# Altium PCB pcb_document_of_best_pcb_ever.PcbDoc
Units mm, origin at the board's own origin, x right, y up, seen from the top; angles counter-clockwise.
Board outline 190.37 x 187.07 mm, 2 copper layers (Top Layer, Bottom Layer); 50 components, 85 nets, 270 pads, 57 vias.
Unrouted connection lines stored in the file: 68.
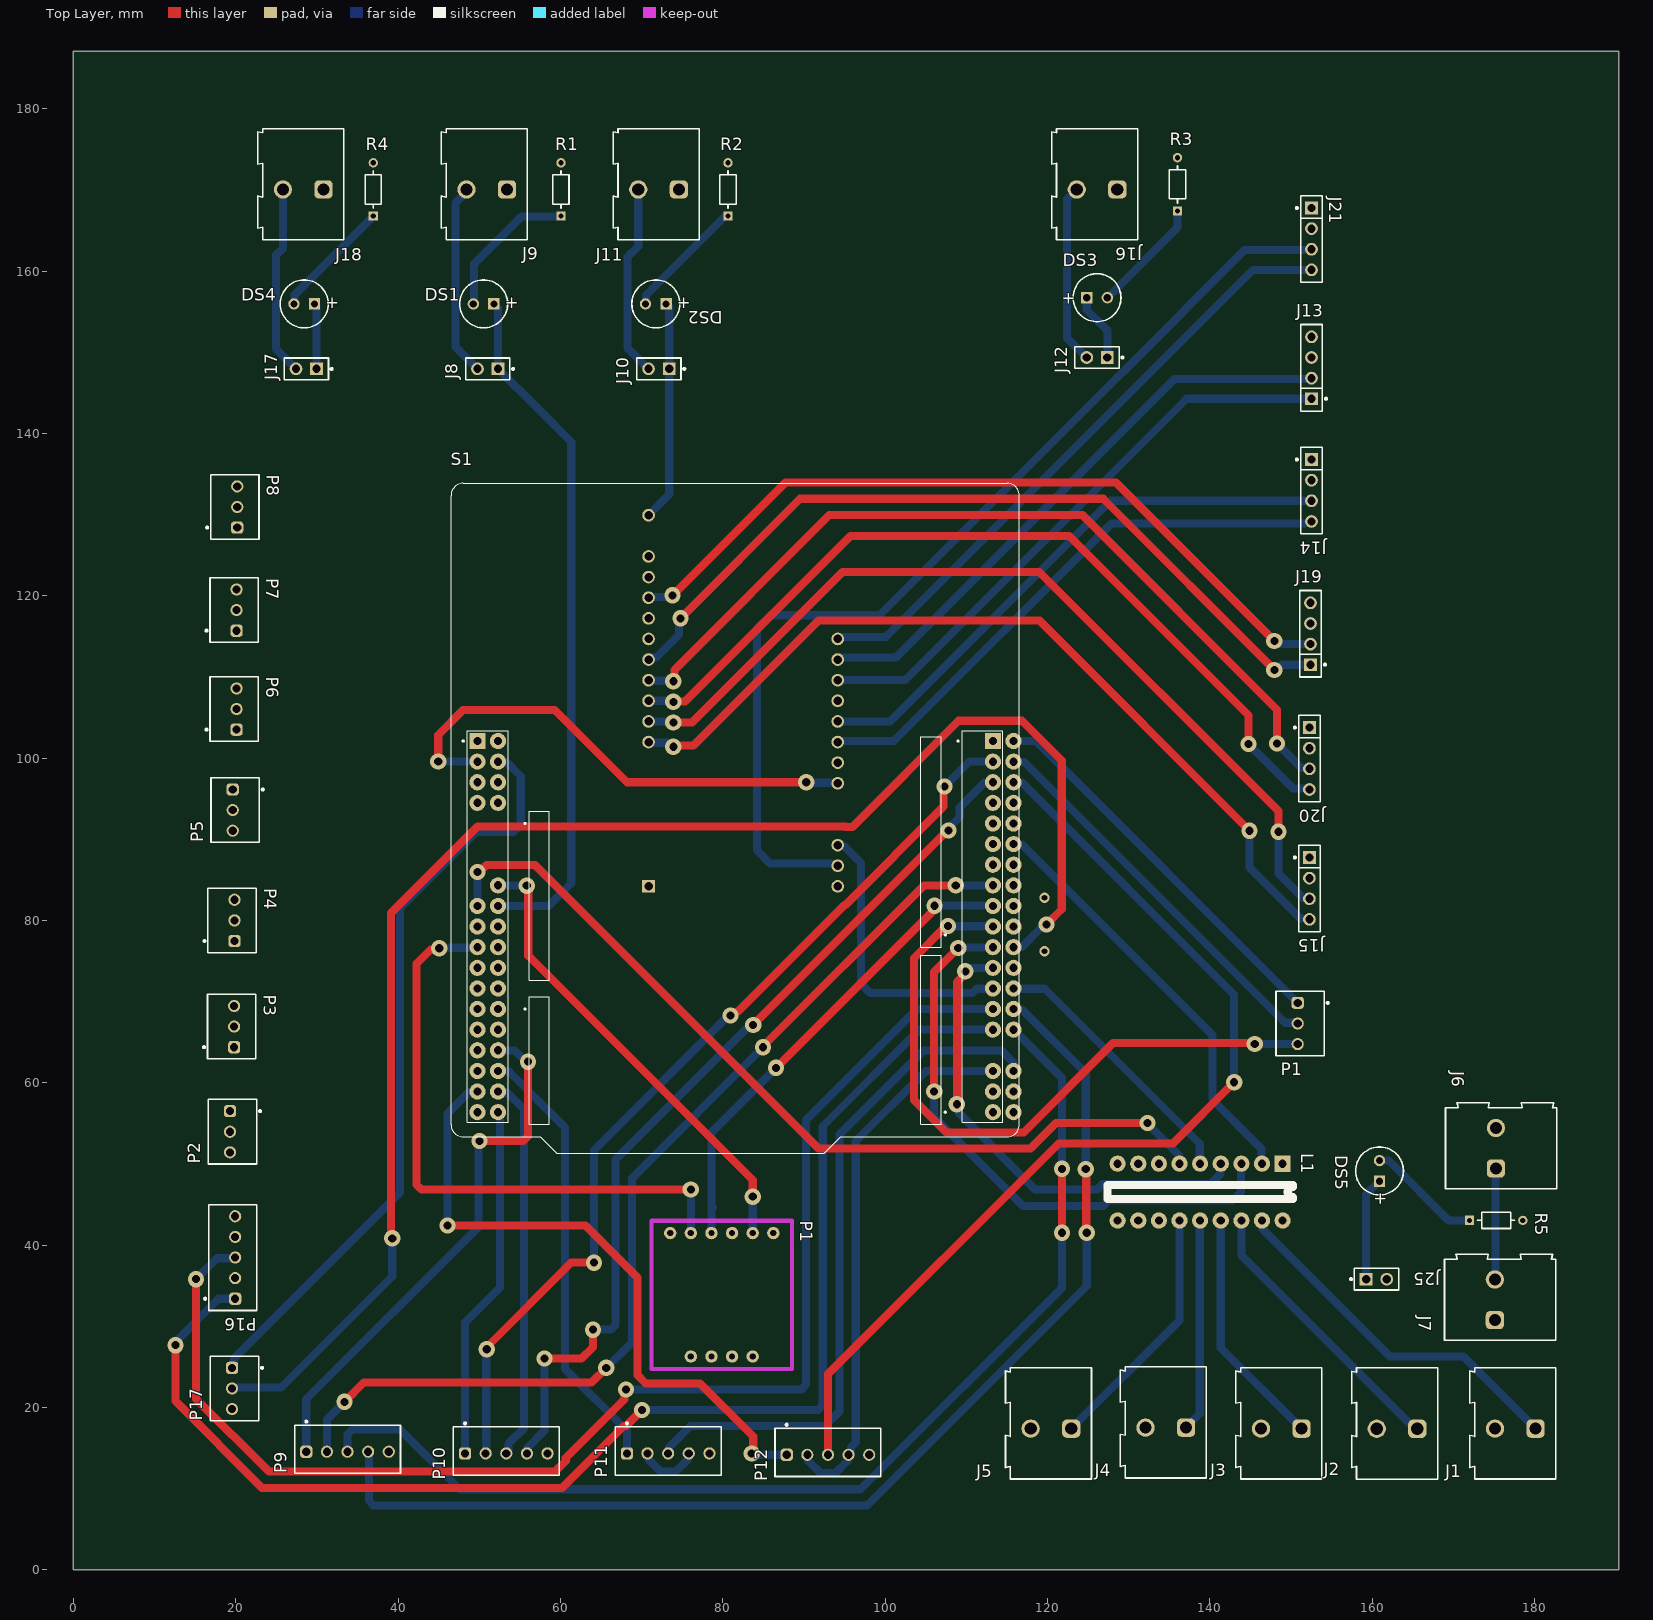
[diagram p0: Top Layer view]
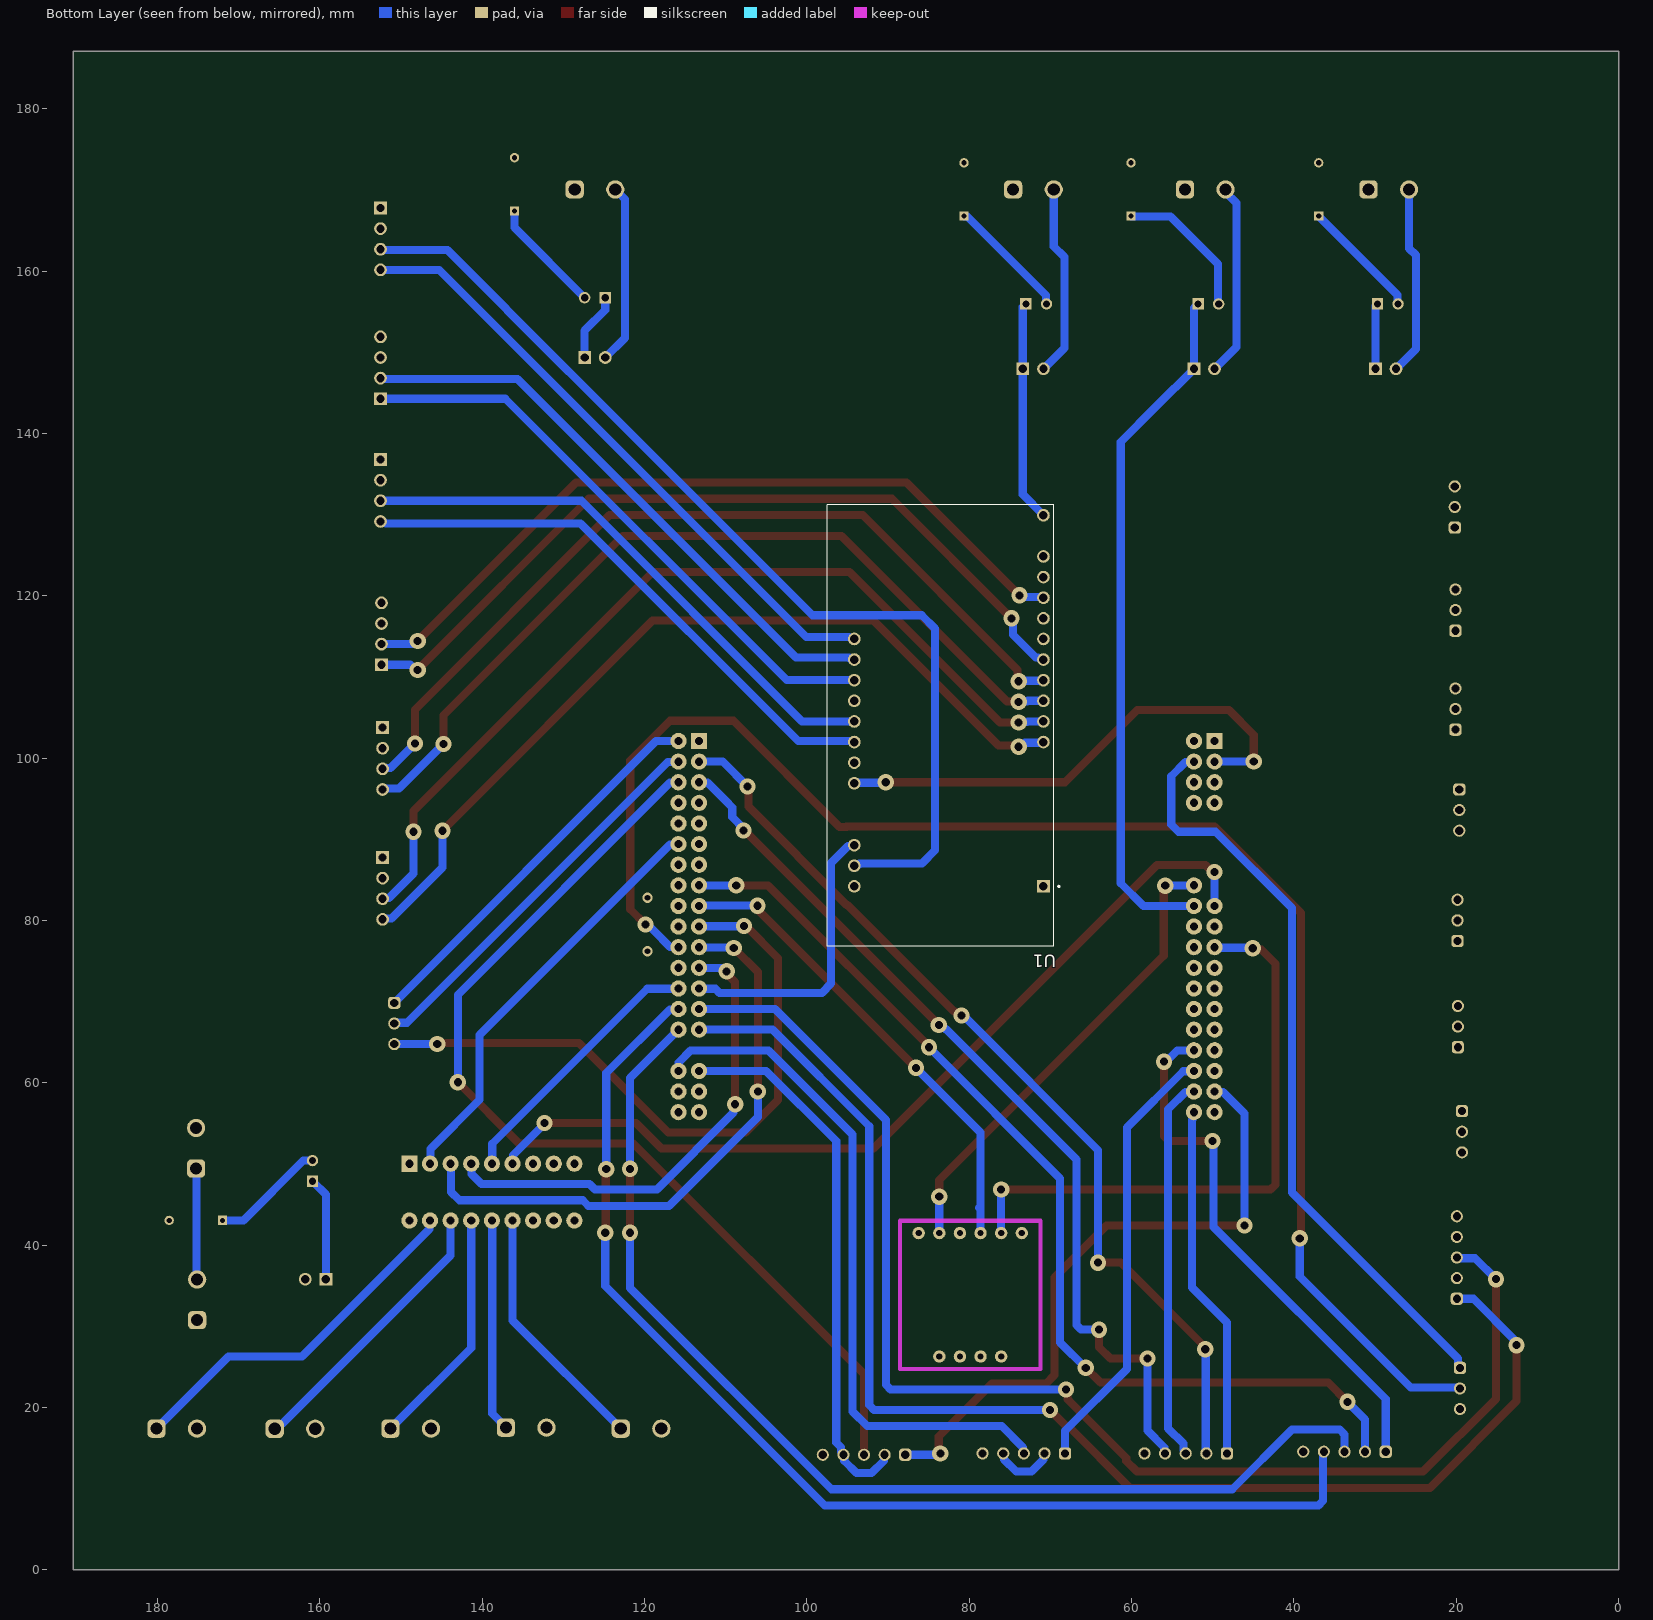
[diagram p1: Bottom Layer view, seen from below]
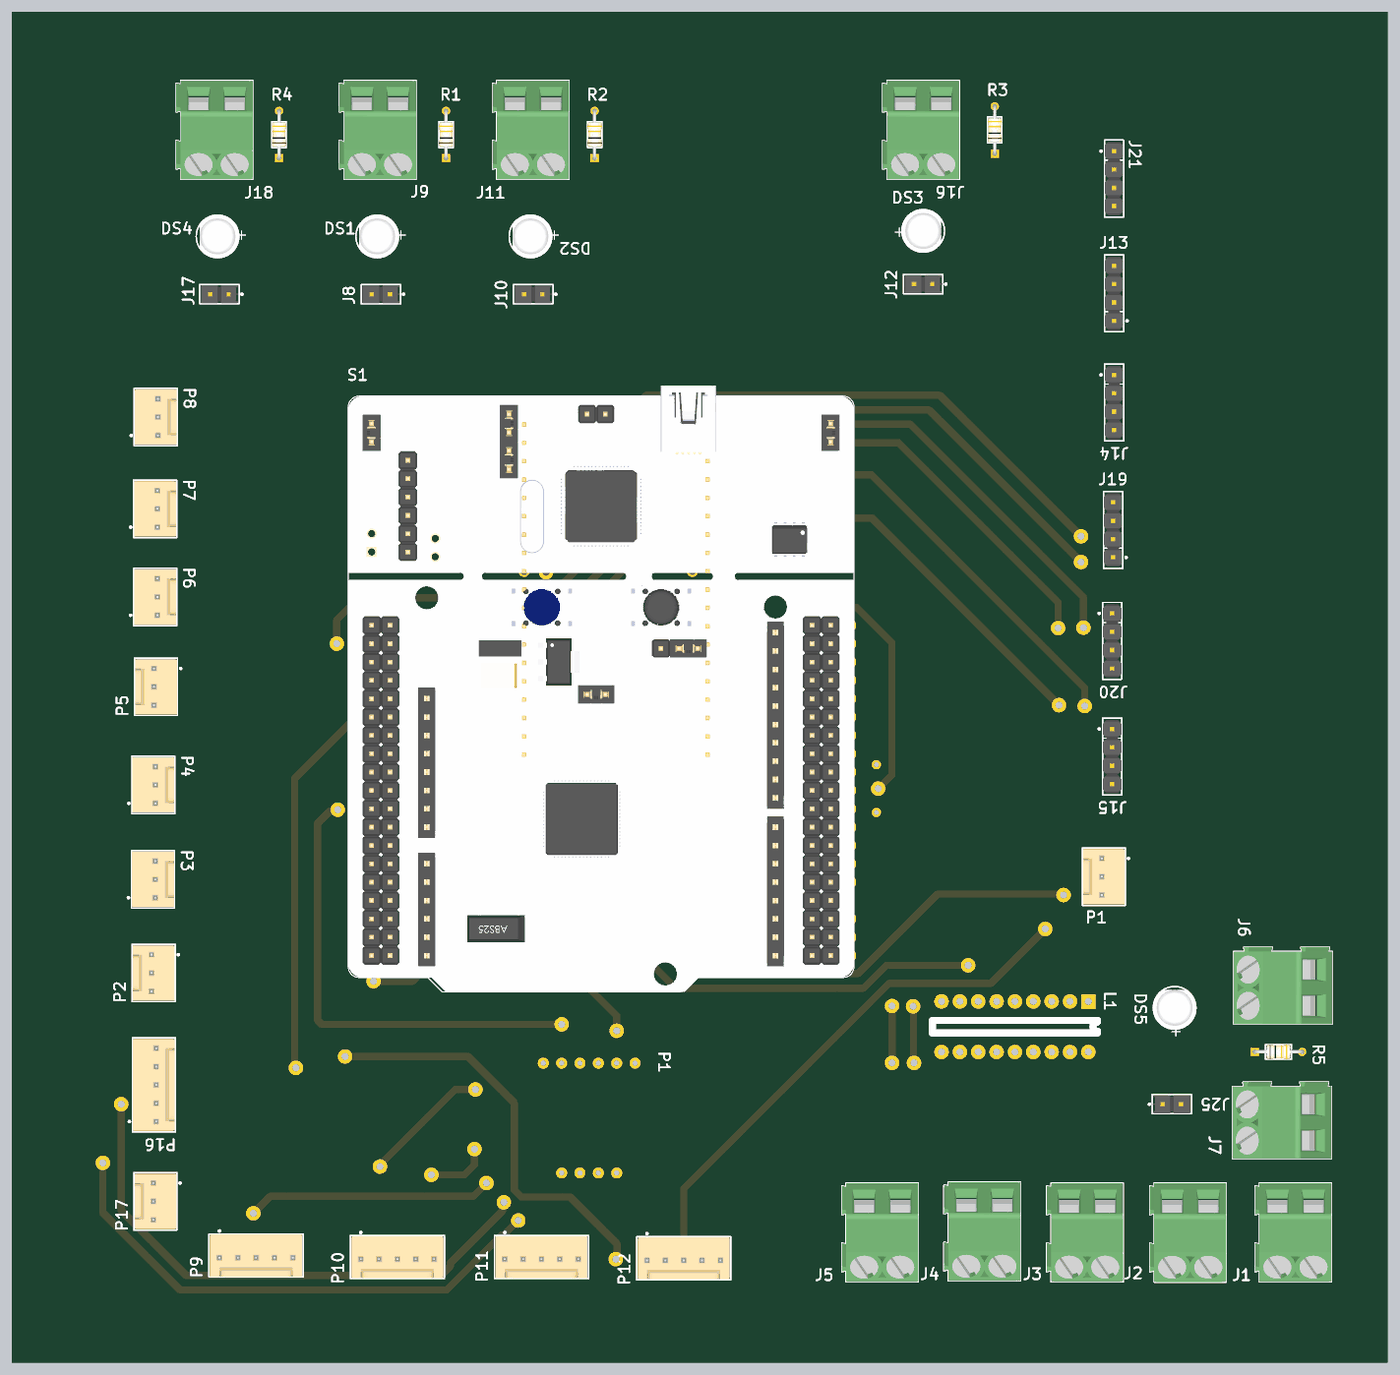
[diagram p2: 3D render of the assembled board from above, using the file's embedded part models]

## Layer stack, top to bottom
Top Solder: solder mask 0.0102, Solder Resist, Dk 3.5
Top Layer: signal copper 0.0356
Dielectric 1: dielectric 0.32, FR-4, Dk 4.8
Bottom Layer: signal copper 0.0356
Bottom Solder: solder mask 0.0102, Solder Resist, Dk 3.5

## Board outline
0,0 190.373,0 190.373,187.071 0,187.071

## Design rules (kind name [scope] priority, off if disabled: settings)
Clearance [All] p1: gap=1 ignorepadtopadclearanceinfootprint=FALSE
PlaneClearance [All] p1: clearance=1
PlaneConnect [All] p1: planeconnectstyle=Relief reliefexpansion=1 reliefentries=4 reliefconductorwidth=1 reliefairgap=1
PolygonConnect [All] p1: connectstyle=Relief reliefconductorwidth=1 reliefentries=4 polygonreliefangle="90 Angle" airgapwidth=1
RoutingCorners [All] p1: cornerstyle=45-Degree minsetback=0.5 maxsetback=1
RoutingVias [All] p1: holewidth=1 width=1 viastyle="Through Hole" minholewidth=0.711 minwidth=0.5 maxholewidth=1 maxwidth=1
SolderMaskExpansion [All] p1: expansion=0 istentingtop=FALSE
SupplyNets "Schematic Supply Nets" [InNet('GND')] p1: voltage=0.000
Width [InNetClass('All Nets')] p1: maxlimit=2 minlimit=0.5 preferedwidth=1
27 further rules are at their usual default settings.

## Components (designator, comment, footprint, x,y, rotation, side; value= is the part's Value field where it differs from the comment)
DS1 "WP7113SYD" KING-WP7113SYD_V 50.546,155.956 r180 top
DS2 "WP7113SYD" KING-WP7113SYD_V 71.755,155.956 r180 top
DS3 "WP7113SYD" KING-WP7113SYD_V 126.111,156.718 r0 top
DS4 "WP7113SYD" KING-WP7113SYD_V 28.448,155.956 r180 top
DS5 "WP7113SYD" KING-WP7113SYD_V 160.909,49.149 r90 top
J1 "691211720002" 691211720002 177.633,18.049 r180 top
J2 "691211720002" 691211720002 163.068,18.034 r180 top
J3 "691211720002" 691211720002 148.804,18.049 r180 top
J4 "691211720002" 691211720002 134.58,18.176 r180 top
J5 "691211720002" 691211720002 120.436,18.049 r180 top
J6 "691211720002" 691211720002 175.895,51.943 r90 top
J7 "691211720002" 691211720002 175.768,33.274 r90 top
J8 "TSW-102-07-L-S" FP-TSW-102-07-L-S-MFG 51.054,147.955 r180 top
J9 "691211720002" 691211720002 50.927,170.703 r180 top
J10 "TSW-102-07-L-S" FP-TSW-102-07-L-S-MFG 72.136,147.955 r180 top
J11 "691211720002" 691211720002 72.096,170.703 r180 top
J12 "TSW-102-07-L-S" FP-TSW-102-07-L-S-MFG 126.111,149.352 r180 top
J13 "M20-9990445" FP-M20-9990445-MFG 152.527,148.082 r90 top
J14 "M20-9990445" FP-M20-9990445-MFG 152.527,132.969 r270 top
J15 "M20-9990445" FP-M20-9990445-MFG 152.273,83.947 r270 top
J16 "691211720002" 691211720002 126.111,170.703 r180 top
J17 "TSW-102-07-L-S" FP-TSW-102-07-L-S-MFG 28.702,147.955 r180 top
J18 "691211720002" 691211720002 28.321,170.703 r180 top
J19 "M20-9990445" FP-M20-9990445-MFG 152.4,115.316 r90 top
J20 "M20-9990445" FP-M20-9990445-MFG 152.273,99.949 r270 top
J21 "M20-9990445" FP-M20-9990445-MFG 152.527,163.957 r270 top
J25 "TSW-102-07-L-S" FP-TSW-102-07-L-S-MFG 160.528,35.814 r0 top
L1 "Component_1" DIP18 148.971,50.038 r270 top
P1 "Component_1" PCBComponent_1#1 73.533,41.489 r270 top
P1 "61900311121" 61900311121 151.13,67.31 r90 top
P2 "61900311121" 61900311121 19.604,53.975 r90 top
P3 "61900311121" 61900311121 19.512,66.929 r270 top
P4 "61900311121" 61900311121 19.558,80.01 r270 top
P5 "61900311121" 61900311121 19.939,93.599 r90 top
P6 "61900311121" 61900311121 19.812,106.045 r270 top
P7 "61900311121" 61900311121 19.812,118.237 r270 top
P8 "61900311121" 61900311121 19.893,130.937 r270 top
P9 "61900511121" 61900511121 33.782,14.859 r180 top
P10 "61900511121" 61900511121 53.34,14.651 r180 top
P11 "61900511121" 61900511121 73.279,14.651 r180 top
P12 "61900511121" 61900511121 92.964,14.478 r180 top
P16 "61900511121" 61900511121 19.639,38.481 r270 top
P17 "61900311121" 61900311121 19.858,22.352 r90 top
R1 "CF18JT10K0" FP-CF18-MFG 60.071,170.053 r90 top value=10kΩ
R2 "CF18JT10K0" FP-CF18-MFG 80.645,170.053 r90 top value=10kΩ
R3 "CF18JT10K0" FP-CF18-MFG 136.017,170.688 r90 top value=10kΩ
R4 "CF18JT10K0" FP-CF18-MFG 36.957,170.053 r90 top value=10kΩ
R5 "CF18JT10K0" FP-CF18-MFG 175.282,43.053 r0 top value=10kΩ
S1 "Component_1" PCBComponent_1#2 87.63,95.885 r0 top locked
U1 "ESP32-DEVKITC-32D" MODULE_ESP32-DEVKITC-32D 83.566,103.961 r0 bottom locked

## Footprints (in the part's own frame and the unit in brackets; to place one, negate y for a bottom-side part, rotate by r counter-clockwise, add the part's x,y. Pads: shape width x height; smd on the part's side, far side on the other; paste and mask are expansions set on the pad)
61900311121 [mm] "2.54mm Male Locking Header, 3p"
  rrect50% 1.5x1.5 hole 1: 1(2.54,0.3)
  round 1.5 hole 1: 2(0,0.3) 3(-2.54,0.3)
  silkscreen extent -3.98,-3.52 3.98,2.98, body extent -3.81,-2.9 3.81,2.9, height 11.53
61900511121 [mm] "2.54mm Male Locking Header, 5p"
  rrect50% 1.5x1.5 hole 1: 1(5.08,0.3)
  round 1.5 hole 1: 2(2.54,0.3) 3(0,0.3) 4(-2.54,0.3) 5(-5.08,0.3)
  silkscreen extent -6.52,-3.52 6.52,2.97, body extent -6.35,-2.9 6.35,2.9, height 11.53
691211720002 [mm] "5,00mm - modular - green -45¡ã entry with rising cage clamp - 02p"
  rrect50% 2.25x2.25 hole 1.5: 1(-2.5,0.65)
  round 2.25 hole 1.5: 2(2.5,0.65)
  silkscreen extent -5,-6.85 5.6,6.85, body extent -5,-6.85 5.6,6.85, height 15.72
DIP18 [mm]
  rect 2x2 hole 1: 1(0,0)
  round 2 hole 1: 2(0,-2.54) 3(0,-5.08) 4(0,-7.62) 5(0,-10.16) 6(0,-12.7) 7(0,-15.24) 8(0,-17.78) 9(0,-20.32) 10(7,-20.32) 11(7,-17.78) 12(7,-15.24) 13(7,-12.7) 14(7,-10.16) 15(7,-7.62) 16(7,-5.08) 17(7,-2.54) 18(7,0)
  silkscreen extent 2.63,-21.59 4.36,1.27
FP-CF18-MFG [mm]
  rect 1.15x1.15 hole 0.65 paste-2539.97 mask+0: 1(-3.28,0)
  round 1.15 hole 0.65 paste-2539.97 mask+0: 2(3.28,0)
  silkscreen extent -2.3,-1 2.3,1, body extent -3.96,-1.1 3.96,1.1, height 0.25
FP-M20-9990445-MFG [mm]
  rect 1.57x1.57 hole 1.02 paste-2539.97 mask+0: 1(-3.81,0)
  round 1.57 hole 1.02 paste-2539.97 mask+0: 2(-1.27,0) 3(1.27,0) 4(3.81,0)
  silkscreen extent -5.33,-1.92 5.33,1.32, body extent -5.43,-1.42 5.43,1.42, height 0.25
FP-TSW-102-07-L-S-MFG [mm]
  rect 1.57x1.57 hole 1.02 paste-2539.97 mask+0: 1(-1.27,0)
  round 1.57 hole 1.02 paste-2539.97 mask+0: 2(1.27,0)
  silkscreen extent -3.25,-1.34 2.73,1.34, body extent -2.83,-1.44 2.83,1.44, height 0.25
KING-WP7113SYD_V [mm] "THD, 2-Leads, Dia 5.9mm, Body Length 8.6mm"
  rect 1.4x1.4 hole 0.889: 1(-1.27,0)
  round 1.4 hole 0.889: 2(1.27,0)
  silkscreen extent -2.95,-2.95 2.95,2.95, body extent -2.95,-2.95 2.5,2.95, height 15.5
MODULE_ESP32-DEVKITC-32D [mm]
  rect 1.56x1.56 / inner round 1.56 / far side rect 1.56x1.56 hole 1.04: J2-1(-12.7,19.76)
  round 0 all layers, no hole: J2-2(-12.7,17.22) J2-3(-12.7,14.68) J2-4(-12.7,12.14) J2-5(-12.7,9.6) J2-6(-12.7,7.06) J2-7(-12.7,4.52) J2-18(-12.7,-23.42) J3-4(10.6,12.14) J3-5(10.6,9.6) J3-14(10.6,-13.26) J3-15(10.6,-15.8) J3-16(10.6,-18.34) J3-17(10.6,-20.88) J3-18(10.6,-23.42) J3-19(10.6,-25.96)
  round 1.56 hole 1.04: J2-8(-12.7,1.98) J2-9(-12.7,-0.56) J2-10(-12.7,-3.1) J2-11(-12.7,-5.64) J2-12(-12.7,-8.18) J2-13(-12.7,-10.72) J2-14(-12.7,-13.26) J2-15(-12.7,-15.8) J2-16(-12.7,-18.34) J2-17(-12.7,-20.88) J2-19(-12.7,-25.96) J3-1(10.6,19.76) J3-2(10.6,17.22) J3-3(10.6,14.68) J3-6(10.6,7.06) J3-7(10.6,4.52) J3-8(10.6,1.98) J3-9(10.6,-0.56) J3-10(10.6,-3.1) J3-11(10.6,-5.64) J3-12(10.6,-8.18) J3-13(10.6,-10.72)
  silkscreen extent -14.7,-27.25 13.95,27.15, body extent -13.97,-27.9 13.97,27.2, height 6.69
PCBComponent_1#1 [mil]
  round 60 hole 30: 3V3(0,400) ADR(598.43,300) GND(0,300) INT(598.43,400) PS0(598.43,200) PS1(598.43,100) RST(0,0) SCL(0,200) SDA(0,100) VIN(0,500)
  Keep-Out Layer lines w19.68: -60,545 -60,590 660,590 660,-90 -60,-90 -60,565
PCBComponent_1#2 [mil]
  rect 78.74x78.74 hole 40.16: 1(-1490,245) 58(1010,245)
  round 78.74 hole 40.16: 2(-1390,245) 3(-1490,145) 4(-1390,145) 5(-1490,45) 6(-1390,45) 7(-1490,-55) 8(-1390,-55) 16(-1390,-455) 17(-1490,-555) 18(-1390,-555) 19(-1490,-655) 20(-1390,-655) 21(-1490,-755) 22(-1390,-755) 23(-1490,-855) 24(-1390,-855) 25(-1490,-955) 26(-1390,-955) 27(-1490,-1055) 28(-1390,-1055) 29(-1490,-1155) 30(-1390,-1155) 31(-1490,-1255) 32(-1390,-1255) 33(-1490,-1355) 34(-1390,-1355) 35(-1490,-1455) 36(-1390,-1455) 37(-1490,-1555) 38(-1390,-1555) 39(1110,245) 40(1110,145) 41(1110,45) 42(1110,-55) 43(1110,-155) 44(1110,-255) 45(1110,-355) 46(1110,-455) 47(1110,-555) 48(1110,-655) 49(1110,-755) 50(1110,-855) 51(1110,-955) 52(1110,-1055) 53(1110,-1155) 55(1110,-1355) 56(1110,-1455) 57(1110,-1555) 59(1010,145) 60(1010,45) 61(1010,-55) 62(1010,-155) 63(1010,-255) 64(1010,-355) 65(1010,-455) 66(1010,-555) 67(1010,-655) 68(1010,-755) 69(1010,-855) 70(1010,-955) 71(1010,-1055) 72(1010,-1155) 74(1010,-1355) 75(1010,-1455) 76(1010,-1555)
  round 0 all layers, no hole: 9(-1490,-155) 10(-1390,-155) 11(-1490,-255) 12(-1390,-255) 13(-1490,-355) 14(-1390,-355) 15(-1490,-455) 54(1110,-1255) 73(1010,-1255)
  silkscreen extent -1618,-1753 1138,1495, body extent -1618,-1753 1138,1552, height 483

## Part data
DS1 DS2 DS3 DS4 DS5: library part CMP-1757-00003-1, "The Super Bright Yellow Device, 2 V, -40 to 85 degC, 2-Pin THD, RoHS, Tape and Reel", Case\Package=Axial, Max Operating Temperature="155 degC", Min Operating Temperature="-55 degC", Package Quantity=200, Power Rating="250 mW", Resistance="22.1 kohm", Tolerance=1%, Voltage Rating="250 V", ComponentLink1Description=Datasheet, ComponentLink1URL=http://www.kingbrightusa.com/images/catalog/SPEC/WP7113SYD.pdf, DatasheetVersion="Rev. 7B, 01/2015", Length="0.248 inch", Mount="Through Hole", PackageDescription="2-Pin Through Hole Device, Dia 5.9 mm, Body Length 8.6 mm", PackageReference=WP7113SYD, Packaging=Bulk, RoHSCompliant=true
J1 J2 J3 J4 J5 J6 J7 J9 J11 J16 J18: library part CMP-1502-02524-3, "211 Series 5MM Pitch Straight, Pcb Terminal Block, Through Hole, 2 Way", Color=Green, Current=10A, Max Operating Temperature=105°C, Min Operating Temperature=-40°C, Voltage=300V, Connector Type="PCB, Terminal Block", Contact Material=Brass, Contact Plating=Tin, Height=15.5mm, Housing Material=Nylon, Lead Pitch=5mm, Length=13.7mm, Mount="Through Hole", Number of Contacts=2, Number of Levels=1, Number of Pins=2, Number of Positions Per Level=2, Packaging=Box, Pitch=5.0038mm, Plating="Brass, Steel", REACH SVHC=Unknown, RoHS=Compliant, Stripping Length=-7mm, Termination=Screw, Width=10mm, Wire Gauge (Max)=24AWG, Wire Gauge (Min)=12AWG, Wire/Cable Gauge=12AWG
J8 J10 J12 J17 J25: library part CMP-02766-001428-1, "CONN HEADER VERT 2POS 2.54MM", Color=Black, Current Rating=7.6A, Max Operating Temperature=125°C, Max Voltage Rating (AC)=550V, Min Operating Temperature=-55°C, Package Quantity=1, Connector Type="Male Pin", Contact Material=Bronze, Contact Mating Length=0.23inch, Contact Plating=Gold, Contact Type="Male Pin", Depth=2.54mm, Gender=Male, Housing Color=Black, Housing Material=Polyester, Lead Free="Lead Free", Length=5.08mm, Max Current Rating=7.6A, Mount="Through Hole", Number of Contacts=2, Number of Positions=2, Number of Rows=1, Orientation=Straight, Packaging=Bulk, Pitch=2.54mm, Radiation Hardening=No, REACH SVHC="No SVHC", RoHS Compliant=Yes, Series=TSW, Termination=Solder, Voltage Rating=550V, Width=2.54mm
J13 J14 J15 J19 J20 J21: library part CMP-00671-05399696-1, "M20-9990445 Conn Unshrouded Header HDR 4 POS 2.54mm Solder ST Thru-Hole Bulk/Loose", Case/Package=SIL, Color=Black, Contact Resistance=25mΩ, Current Rating=3A, Insulation Resistance=10GΩ, Max Operating Temperature=105°C, Min Operating Temperature=-40°C, Voltage Rating (AC)=750V, Connector Type="Male Pin", Contact Material="Brass, Bronze, Gold, Nickel", Contact Mating Length=6.096mm, Contact Plating=Gold, Depth=2.54mm, Gender=Male, Height=2.54mm, Housing Color=Black, Housing Material=Nylon, Lead Pitch=2.54mm, Length=10.16mm, Max Current Rating=3A, Mount="Through Hole", NexarPartId=5399696, Number of Contacts=4, Number of Pins=4, Number of Positions=4, Number of Rows=1, Orientation=Straight, Pitch=2.54mm, Radiation Hardening=No, REACH SVHC="No SVHC", RoHS=Compliant, Termination=Solder, Voltage Rating (DC)=750V, Weight=45.359237g, Width=12.7mm
P1 P2 P3 P4 P5 P6 P7 P8 P17: library part CMP-1502-00585-3, "Wr-wtb Series, 2.54MM Pitch 3 Way 1 Row Straight Pcb Header, Through Hole", Color=Beige, Contact Resistance=20mΩ, Current Rating=3A, Flammability Rating="UL94 V-0", Insulation Resistance=1GΩ, Max Operating Temperature=105°C, Min Operating Temperature=-40°C, Operating Supply Voltage=250V, Connector Type="Male Pin", Contact Gender=Male, Contact Material=Copper, Contact Mating Length=7.493mm, Contact Plating=Tin, Fastening Type=Friction, Gender=Male, Height=12.5mm, Housing Material=Nylon, Lead Pitch=2.54mm, Length=7.62mm, Mount="Through Hole", Number of Contacts=3, Number of Pins=3, Number of Positions=3, Number of Rows=1, Orientation=Vertical, Packaging=Bulk, Pitch=2.54mm, RoHS=Compliant, Termination="Through Hole", Voltage Rating=250V, Width=7.66mm
P9 P10 P11 P12 P16: library part CMP-1502-00587-3, "Wr-wtb Series, 2.54MM Pitch 5 Way 1 Row Straight Pcb Header, Through Hole", Color=Beige, Contact Resistance=20mΩ, Current Rating=3A, Flammability Rating="UL94 V-0", Insulation Resistance=1GΩ, Max Operating Temperature=105°C, Min Operating Temperature=-40°C, Operating Supply Voltage=250V, Connector Type="Male Pin", Contact Gender=Male, Contact Material=Copper, Contact Mating Length=7.493mm, Contact Plating=Tin, Fastening Type=Friction, Gender=Male, Height=12.5mm, Housing Material=Nylon, Lead Free="Lead Free", Lead Pitch=2.54mm, Length=12.7mm, Mount="Through Hole", Number of Contacts=5, Number of Pins=5, Number of Positions=5, Number of Rows=1, Orientation=Vertical, Packaging=Bulk, Pitch=2.54mm, RoHS=Compliant, Termination="Through Hole", Voltage Rating=250V, Width=12.74mm
R1 R2 R3 R4 R5: library part CMP-26528-000002-1, "RES 10K OHM 1/8W 5% CF AXIAL", Manufacturer="Stackpole Electronics", Package=CF18, Power Rating=0.125W, Resistance=10kΩ, Temperature="-55°C to +155°C", Temperature Coefficient=0-500ppm/°C, Temperature Range High=+155°C, Temperature Range Low=-55°C, Tolerance=5%, Voltage Rating=250V, Automotive=No, Category=Res, ComponentLink2Description=Datasheet, ComponentLink2URL=http://www.seielect.com/Catalog/SEI-CF_CFM.pdf, Composition="Carbon Film", Device Class L1="Passive Components", Device Class L2=Resistors, Device Class L3="Through-Hole Resistors", Digikey Description="RES 10K OHM 1/8W 5% CF AXIAL", Height=2mm, Ipc Land Pattern Name=RESAD656W65L360D200, Lead Free=Yes, Manufacturer Part Number=CF18JT10K0, Octopart=https://octopart.com/cf18jt10k0-stackpole+electronics-19205642, RoHS=TRUE, Series=CF
U1: "WiFi Development Tools (802.11) ESP32 General Development Kit, ESP32-WROOM-32D on the board", Package=None, Check_prices=https://www.snapeda.com/parts/ESP32-DEVKITC-32D/Espressif+Systems/view-part/?ref=eda, MF="Espressif Systems", MP=ESP32-DEVKITC-32D, SnapEDA_Link=https://www.snapeda.com/parts/ESP32-DEVKITC-32D/Espressif+Systems/view-part/?ref=snap

## Via types
v1: diameter 2, hole 1, Top Layer to Bottom Layer, 55 vias
v2: diameter 1.27, hole 0.711, Top Layer to Bottom Layer, 2 vias

## Nets (pads, with @x,y where several pads share a name; then routed paths per layer and width w, separated by ;. In a path a pad name is that pad's centre, name@x,y a point inside that pad or via, vN(x,y) a via of type N, cw(c..) or ccw(c..) an arc to the next point about the centre after c; other vN are vias at no path point)
e1_ch1: J13.1 U1.J3-11 | length 72.7
  Bottom Layer w1: U1.J3-11 102.489,109.601 137.16,144.272 J13.1
e1_ch2: J13.2 U1.J3-12 | length 72.7
  Bottom Layer w1: U1.J3-12 94.273,112.248 94.669,112.248 94.822,112.401 101.352,112.401 135.654,146.703 152.418,146.703 J13.2
e2_ch1: J14.3 U1.J3-9 | length 69.6
  Bottom Layer w1: U1.J3-9 100.584,104.521 127.762,131.699 J14.3
e2_ch2: J14.4 U1.J3-8 | length 69.6
  Bottom Layer w1: U1.J3-8 94.273,102.088 101.072,102.088 127.889,128.905 151.87,128.905 152.015,129.05 152.418,129.05 J14.4
e3_ch1: J19.2 U1.J2-15 | length 95.7
  Top Layer w1: v1(73.812,120.053) 87.715,133.956 128.426,133.956 v1(147.955,114.427)
  Bottom Layer w1: U1.J2-15 70.973,119.868 73.628,119.868 v1(73.812,120.053) ; v1(147.955,114.427) 148.226,114.427 148.607,114.046 J19.2
e3_ch2: J19.1 U1.J2-12 | length 99.8
  Top Layer w1: v1(74.803,117.221) 89.538,131.956 126.87,131.956 v1(147.955,110.871)
  Bottom Layer w1: U1.J2-12 70.973,112.248 71.369,112.248 71.522,112.401 71.81,112.401 74.612,115.202 74.612,117.03 v1(74.803,117.221) ; v1(147.955,110.871) 148.226,110.871 148.861,111.506 J19.1
e4_ch1: J20.3 U1.J2-11 | length 106.1
  Top Layer w1: v1(73.914,109.474) 74.047,109.607 74.047,110.877 93.126,129.956 124.298,129.956 148.295,105.959 v1(148.295,101.786)
  Bottom Layer w1: U1.J2-11 70.929,109.537 73.85,109.537 v1(73.914,109.474) ; v1(148.295,101.786) 151.292,98.788 152.164,98.788 J20.3
e4_ch2: J20.4 U1.J2-10 | length 105
  Top Layer w1: v1(73.914,106.934) 73.954,106.974 75.351,106.974 95.758,127.381 122.682,127.381 144.78,105.283 v1(144.78,101.727)
  Bottom Layer w1: U1.J2-10 72.791,107.061 72.878,106.974 73.874,106.974 v1(73.914,106.934) ; v1(144.78,101.727) 150.259,96.248 152.164,96.248 J20.4
e5_ch1: J15.3 U1.J2-9 | length 110.3
  Top Layer w1: v1(73.914,104.394) 76.2,104.394 94.742,122.936 118.999,122.936 148.463,93.472 v1(148.463,90.932)
  Bottom Layer w1: U1.J2-9 72.791,104.521 72.878,104.434 73.874,104.434 v1(73.914,104.394) ; v1(148.463,90.932) 148.463,85.796 151.472,82.786 152.164,82.786 J15.3
e5_ch2: J15.4 U1.J2-8 | length 106
  Top Layer w1: v1(73.914,101.394) 74.08,101.56 76.414,101.56 91.815,116.961 119.005,116.961 v1(144.907,91.059)
  Bottom Layer w1: U1.J2-8 70.956,101.891 73.146,101.891 73.643,101.394 v1(73.914,101.394) ; v1(144.907,91.059) 144.907,86.523 151.184,80.246 152.164,80.246 J15.4
E5V: DS3.1 J12.1 J13.3 J14.2 J15.2 J19.3 J20.2 J21.2 | length 8.4
  Bottom Layer w1: DS3.1 124.84,156.717 124.84,155.195 127.381,152.654 J12.1
e6_ch1: J21.3 U1.J3-2 | length 125.9
  Bottom Layer w1: U1.J3-2@94.166,86.482 94.166,86.589 93.907,86.848 93.663,86.848 93.51,87.001 85.846,87.001 84.201,88.646 84.201,115.951 85.852,117.602 99.314,117.602 128.779,147.067 128.787,147.067 129.666,147.946 129.666,147.954 144.29,162.578 152.418,162.578 J21.3
e6_ch2: J21.4 U1.J3-13 | length 77.2
  Bottom Layer w1: U1.J3-13 94.273,114.788 94.669,114.788 94.822,114.941 100.082,114.941 145.288,160.147 J21.4
esp_pwr: DS2.1 J10.1 U1.J2-19 | length 27.2
  Bottom Layer w1: U1.J2-19 73.406,132.461 J10.1 73.406,155.575 DS2.1
fl_dir: P9.3 S1.53 | length 138
  Top Layer w1: v1(121.793,41.529) v1(121.793,49.403)
  Bottom Layer w1: P9.3 33.782,16.686 34.368,17.272 40.259,17.272 47.603,9.928 96.976,9.928 121.793,34.745 v1(121.793,41.529) ; S1.53 121.793,60.579 v1(121.793,49.403)
fl_pwm: P9.4 S1.52 | length 144.4
  Top Layer w1: v1(124.714,49.363) 124.777,49.3 124.777,41.593 v1(124.841,41.529)
  Bottom Layer w1: P9.4 36.418,14.463 36.418,8.514 37.003,7.928 97.804,7.928 124.841,34.965 v1(124.841,41.529) ; S1.52 115.864,69.048 116.86,69.048 124.714,61.194 v1(124.714,49.363)
fr_dir: P9.1 S1.32 | length 66.8
  Top Layer w1: v1(50.038,52.832) 55.421,52.832 56.007,53.418 v1(56.007,62.611)
  Bottom Layer w1: P9.1 28.702,21.051 49.911,42.26 49.911,52.705 v1(50.038,52.832) ; S1.32 52.364,63.968 54.379,63.968 55.736,62.611 v1(56.007,62.611)
fr_pwm: P9.2 S1.65 | length 125.3
  Top Layer w1: v1(33.401,20.701) 35.774,23.074 63.841,23.074 v1(65.659,24.892) ; v1@84.807,64.36 104.775,84.328 v1(108.712,84.328)
  Bottom Layer w1: P9.2 31.242,18.542 v1(33.401,20.701) ; v1(65.659,24.892) 68.802,28.035 68.802,48.228 v1(84.963,64.389) ; v1(108.712,84.328) S1.65
front_rack_pwm: P11.2 P11.4 S1.64 | length 7.7
  Bottom Layer w1: P11.2 70.835,14.255 70.835,13.613 72.347,12.101 74.211,12.101 75.723,13.613 75.723,14.255 P11.4
GND: J7.1 J9.1 J11.1 J13.4 J14.1 J15.1 J16.1 J18.1 J19.4 J20.1 J21.1 L1.9 P1.GND P2.3 P3.1 P4.1 P5.3 P6.1 P7.1 P8.1 P9.5 P10.5 P11.5 P12.5 P16.5 P17.3 R1.2 R2.2 R3.2 R4.2 R5.2 S1.8 S1.22 S1.48 S1.62 U1.J3-1 U1.J3-7
imu_pwr: P1.3V3 S1.16 | length 57.9
  Top Layer w1: v1(55.86,84.288) 56.051,84.097 56.051,75.648 83.693,48.006 v1(83.693,45.974)
  Bottom Layer w1: S1.16 52.344,84.308 55.84,84.308 v1(55.86,84.288) ; P1.3V3 v1(83.693,45.974)
motor_1_dir: P16.1 S1.72 | length 165.5
  Top Layer w1: v1(12.573,27.686) 12.573,20.787 23.259,10.101 60.18,10.101 67.809,17.729 68.092,17.729 v1(70.072,19.709)
  Bottom Layer w1: v1(12.573,27.686) 12.764,27.877 12.764,28.258 17.907,33.401 P16.1 ; v1(70.072,19.709) 91.743,19.709 92.329,20.295 92.329,54.644 104.233,66.548 S1.72
motor_1_pwm: P16.2 S1.28
motor_2_dir: P16.3 S1.71 | length 166.1
  Top Layer w1: v1(15.113,35.814) 15.113,21.075 24.087,12.101 59.352,12.101 60.67,13.419 60.67,13.807 67.812,20.949 67.812,20.985 67.881,21.053 67.881,22.034 v1(68.072,22.225)
  Bottom Layer w1: v1(15.113,35.814) 17.684,38.385 19.843,38.385 P16.3 ; v1(68.072,22.225) 89.683,22.225 90.269,22.811 90.269,55.413 103.944,69.088 S1.71
motor_2_pwm: P16.4 S1.30
motor_3_dir: P17.1 S1.4 | length 93.8
  Bottom Layer w1: P17.1 19.808,25.142 19.808,26.031 40.259,46.482 40.259,81.534 49.657,90.932 54.229,90.932 55.118,91.821 55.118,97.77 53.36,99.528 52.364,99.528 S1.4
motor_3_pwm: P17.2 S1.49 | length 191.2
  Top Layer w1: P17.2 P17.2@19.654,22.448 ; v1(39.296,40.841) 39.116,41.021 39.116,80.899 49.778,91.561 95.11,91.561 95.144,91.527 95.972,91.527 109.053,104.608 116.86,104.608 121.769,99.699 121.769,81.383 v1(119.888,79.502)
  Bottom Layer w1: P17.2 19.654,22.448 25.623,22.448 39.296,36.121 v1(39.296,40.841) ; S1.49 115.864,76.748 116.86,76.748 118.914,78.803 118.918,78.803 119.617,79.502 v1(119.888,79.502)
NetDS1_2: DS1.2 R1.1 | length 18.1
  Bottom Layer w1: DS1.2 49.353,156.033 49.353,160.859 55.192,166.698 59.996,166.698 R1.1
NetDS2_2: DS2.2 R2.1 | length 15.2
  Bottom Layer w1: DS2.2 70.562,156.033 70.562,157.014 80.246,166.698 80.57,166.698 R2.1
NetDS3_2: DS3.2 R3.1 | length 14.3
  Bottom Layer w1: DS3.2 136.017,165.354 R3.1
NetDS4_2: DS4.2 R4.1 | length 14.9
  Bottom Layer w1: DS4.2 27.255,156.033 27.255,157.071 R4.1
NetDS5_1: DS5.1 J25.1 | length 12.7
  Bottom Layer w1: J25.1 159.258,46.228 DS5.1
NetDS5_2: DS5.2 R5.1 | length 14.1
  Bottom Layer w1: DS5.2 162.052,50.419 169.418,43.053 R5.1
NetJ6_1: J6.1 J7.2 | length 13.7
  Bottom Layer w1: J7.2 175.182,35.838 175.182,49.379 J6.1
NetJ8_2: J8.2 J9.2 | length 23.8
  Bottom Layer w1: J9.2 48.427,169.715 47.076,168.364 47.076,150.663 J8.2
NetJ10_2: J10.2 J11.2 | length 23.7
  Bottom Layer w1: J11.2 69.596,163.035 68.285,161.724 68.285,150.536 J10.2
NetJ12_2: J12.2 J16.2 | length 22.2
  Bottom Layer w1: J16.2 123.611,170.025 122.428,168.842 122.428,151.765 J12.2
NetJ17_2: J17.2 J18.2 | length 23.5
  Bottom Layer w1: J18.2 25.821,162.801 24.978,161.958 24.978,150.409 J17.2
NetJ22_1: 
NetJ22_2: 
NetJ23_1: 
NetJ23_2: 
NetJ24_1: 
NetJ24_2: 
pnuematic1: L1.2 S1.44 | length 52.6
  Bottom Layer w1: S1.44 115.864,89.368 116.86,89.368 140.335,65.893 140.335,63.246 140.335,57.912 146.391,51.856 146.391,50.078 L1.2
pnuematic2: L1.3 S1.68 | length 72.9
  Top Layer w1: v1(106.045,58.928) 106.045,73.632 v1(109.015,76.602)
  Bottom Layer w1: v1(106.045,58.928) 106.045,55.773 116.987,44.831 126.908,44.831 126.94,44.863 127.615,45.538 137.775,45.538 142.82,45.538 143.851,46.569 143.851,49.998 L1.3 ; v1(109.015,76.602) 109.068,76.655 112.822,76.655 112.875,76.708 S1.68
pnuematic3: L1.4 S1.69 | length 59.5
  Top Layer w1: v1(108.839,57.364) 108.839,72.413 109.887,73.461 v1(109.887,73.732)
  Bottom Layer w1: v1(108.839,57.364) 109.03,57.173 109.03,56.324 118.491,46.863 126.112,46.863 126.787,47.538 137.307,47.538 138.684,47.538 ; v1(109.887,73.732) 110.157,73.732 110.594,74.168 S1.69 ; 138.938,47.538 140.081,47.538 141.311,48.768 141.311,49.998 L1.4
pnuematic_out_1: J1.1 L1.17 | length 44.9
  Bottom Layer w1: L1.17 146.471,42.998 146.471,42.002 162.184,26.289 171.243,26.289 J1.1
pnuematic_out_2: J2.1 L1.16 | length 34.8
  Bottom Layer w1: L1.16 143.891,38.735 164.656,17.97 164.982,17.97 J2.1
pnuematic_out_3: J3.1 L1.15 | length 29.8
  Bottom Layer w1: L1.15 141.351,27.352 J3.1
pnuematic_out_4: J4.1 L1.14 | length 26.2
  Bottom Layer w1: J4.1 137.08,17.56 138.771,19.251 138.771,42.998 L1.14
pnuematic_out_5: J5.1 L1.13 | length 31.2
  Bottom Layer w1: J5.1 136.271,30.734 L1.13
pnuemtaic4: L1.5 S1.51 | length 37.5
  Bottom Layer w1: 49.784,81.788 49.784,85.979 ; S1.51 115.864,71.588 119.674,71.588 138.771,52.491 138.771,50.078 L1.5
pnuemtaic5: L1.6 S1.17 | length 105.3
  Top Layer w1: v1(49.784,85.979) 50.055,85.979 50.904,86.828 56.855,86.828 91.795,51.888 117.914,51.888 121.061,55.035 v1(132.342,55.035)
  Bottom Layer w1: v1(132.342,55.035) 132.342,54.963 136.231,51.074 136.231,50.078 L1.6
prox_bd: P3.2 S1.50
prox_bf: P4.2 S1.46
prox_fd: P6.2 S1.2
prox_ff: P7.2 S1.1
prox_mdl: P8.2 S1.45
prox_mdr: P2.2 S1.37
prox_mf: P5.2 S1.58
rack_front_left_dir: P11.3 S1.55 | length 85.1
  Bottom Layer w1: P11.3 73.375,14.447 73.375,15.089 75.995,17.709 92.572,17.709 94.393,19.53 94.393,53.64 104.721,63.968 114.32,63.968 115.784,62.504 115.784,61.508 S1.55
rack_front_right_dir: P11.1 S1.34 | length 54.4
  Bottom Layer w1: S1.34 52.364,61.428 53.648,61.428 60.579,54.497 60.579,24.765 68.199,17.145 P11.1
rack_rear_left_dir: P12.3 S1.41 | length 123.7
  Top Layer w1: P12.3 92.964,24.11 121.392,52.538 132.227,52.538 132.229,52.535 132.693,52.535 132.695,52.538 135.469,52.538 v1(143.002,60.071)
  Bottom Layer w1: S1.41 115.864,96.988 116.86,96.988 143.002,70.846 v1(143.002,60.071)
rack_rear_right_dir: P12.1 S1.35 | length 80.6
  Top Layer w1: v1(46.101,42.418) 63.099,42.418 69.497,36.02 69.497,24 70.522,22.975 77.213,22.975 83.757,16.43 83.757,14.542 v1(83.566,14.351)
  Bottom Layer w1: v1(46.101,42.418) 46.101,56.241 48.748,58.888 49.744,58.888 S1.35 ; v1(83.566,14.351) 83.739,14.178 P12.1
rear_rack_pwm: P12.2 P12.4 S1.74 | length 67.2
  Bottom Layer w1: P12.2 90.52,14.082 90.52,13.44 92.032,11.928 93.896,11.928 95.408,13.44 95.408,14.082 P12.4 95.504,14.313 95.794,14.603 95.794,15.11 96.393,15.709 96.393,52.812 105.049,61.468 S1.74
rl_dir: P10.3 S1.36 | length 47.4
  Bottom Layer w1: S1.36 52.364,58.888 53.36,58.888 55.499,56.749 55.499,17.44 53.63,15.571 53.63,14.776 53.34,14.486 P10.3
rl_pwm: P10.4 S1.60 | length 111.3
  Top Layer w1: v1(58.039,26.035) 62.611,26.035 64.008,27.432 v1(64.008,29.591) ; v1(83.752,67.134) 107.697,91.079 v1(107.803,91.079)
  Bottom Layer w1: P10.4 55.976,14.447 55.976,15.089 58.039,17.152 v1(58.039,26.035) ; v1(64.008,29.591) 66.216,29.591 66.802,30.177 66.802,50.546 82.89,66.634 82.982,66.634 83.482,67.134 v1(83.752,67.134) ; v1(107.803,91.079) 107.803,91.349 109.193,92.738 109.193,93.932 109.929,94.668 112.248,96.988 113.244,96.988 S1.60
rr_dir: P10.1 S1.38 | length 43.9
  Bottom Layer w1: P10.1 48.26,30.48 52.578,34.798 52.578,55.427 52.515,55.49 52.515,56.197 S1.38
rr_pwm: P10.2 S1.59 | length 114.9
  Top Layer w1: v1(50.927,27.178) 50.927,27.432 61.341,37.846 v1(64.135,37.846) ; v1(80.956,68.28) 81.227,68.28 81.727,68.78 81.862,68.78 95.004,81.921 95.11,81.921 107.209,94.02 107.209,96.414 v1(107.315,96.52)
  Bottom Layer w1: P10.2 50.863,14.414 50.863,27.114 v1(50.927,27.178) ; v1(64.135,37.846) 64.135,51.689 80.726,68.28 v1(80.956,68.28) ; v1(107.315,96.52) 110.363,99.568 S1.59
S5V: DS4.1 J17.1 P2.1 P3.3 P4.3 P5.1 P6.3 P7.3 P8.3 | length 8.1
  Bottom Layer w1: DS4.1 29.972,155.702 J17.1
SCL_esp: S1.70 U1.J3-3 | length 35.6
  Bottom Layer w1: U1.J3-3 94.273,89.174 94.958,89.174 97.028,87.103 97.028,72.214 98.154,71.088 110.779,71.088 111.279,71.588 113.244,71.588 S1.70
scl_imu: P1.SCL S1.66 | length 58.8
  Top Layer w1: v1(86.559,61.849) 105.881,81.171 105.881,81.616 v1(106.072,81.807)
  Bottom Layer w1: P1.SCL 78.613,44.45 78.77,44.607 ; 78.613,44.763 78.613,53.903 v1(86.559,61.849) ; v1(106.072,81.807) 106.093,81.828 113.244,81.828 S1.66
SDA_esp: S1.3 U1.J3-6 | length 62.3
  Top Layer w1: v1(44.958,99.568) 44.958,102.87 48.006,105.918 59.309,105.918 68.199,97.028 v1(90.297,97.028)
  Bottom Layer w1: v1(44.958,99.568) S1.3 ; v1(90.297,97.028) 90.361,96.965 94.102,96.965 U1.J3-6
sda_imu: P1.SDA S1.21 | length 75
  Top Layer w1: v1(45.085,76.581) 44.894,76.39 44.005,76.39 42.291,74.676 42.291,47.449 42.877,46.863 v1(76.073,46.863)
  Bottom Layer w1: v1(45.085,76.581) 45.148,76.644 49.721,76.644 S1.21 ; P1.SDA v1(76.073,46.863)
servo1_pwm: P1.3 S1.67 | length 82.4
  Top Layer w1: v1(107.761,79.328) 107.522,79.328 103.545,75.351 103.545,57.892 107.549,53.888 117.086,53.888 128.095,64.897 145.415,64.897 v1(145.542,64.77)
  Bottom Layer w1: v1(107.761,79.328) 107.801,79.288 113.244,79.288 S1.67 ; v1(145.542,64.77) P1.3
servo2_pwm: P1.2 S1.40 | length 48.4
  Bottom Layer w1: S1.40 115.864,99.528 117.148,99.528 149.27,67.406 150.734,67.406 P1.2
servo3_pwm: P1.1 S1.39 | length 48.4
  Bottom Layer w1: S1.39 118.572,102.108 P1.1
Stm_power: DS1.1 J8.1 S1.18 | length 85.5
  Bottom Layer w1: DS1.1 52.324,155.448 J8.1 56.975,143.304 61.341,138.938 61.341,84.582 58.547,81.788 S1.18
ULN_VCC: J1.2 J2.2 J3.2 J4.2 J5.2 J6.2 J25.2 L1.10
USART_RX: S1.76
USART_TX: S1.75
wire1: 
wire2: 
wire3: 
pads on no net: L1.1 L1.7 L1.8 L1.11 L1.12 L1.18 P1.ADR P1.INT P1.PS0 P1.PS1 P1.RST P1.VIN S1.5 S1.6 S1.7 S1.9 S1.10 S1.11 S1.12 S1.13 S1.14 S1.15 S1.19 S1.20 S1.23 S1.24 S1.25 S1.26 S1.27 S1.29 S1.31 S1.33 S1.42 S1.43 S1.47 S1.54 S1.56 S1.57 S1.61 S1.63 S1.73 U1.J2-1 U1.J2-2 U1.J2-3 U1.J2-4 U1.J2-5 U1.J2-6 U1.J2-7 U1.J2-13 U1.J2-14 U1.J2-16 U1.J2-17 U1.J2-18 U1.J3-4 U1.J3-5 U1.J3-10 U1.J3-14 U1.J3-15 U1.J3-16 U1.J3-17 U1.J3-18 U1.J3-19
copper on no net:
  other v2: 119.634,76.2 119.634,82.804

## Text inside footprints (layer, text, board x,y; h text height)
DS1: Top Overlay "+" at 54.864,156.718 h1.5 r180
DS2: Top Overlay "+" at 76.073,156.718 h1.5 r180
DS3: Top Overlay "+" at 121.793,155.956 h1.5
DS4: Top Overlay "+" at 32.766,156.718 h1.5 r180
DS5: Top Overlay "+" at 161.671,44.831 h1.5 r90